# Altium PCB CLLC_PrimarySide_v5.PcbDoc
Units mm, origin at the board's own origin, x right, y up, seen from the top; angles counter-clockwise.
Board outline 205 x 135 mm, 4 copper layers (Signal_1, Int1 (GND), Int2 (PWR), Signal_2), stack 1.369 mm thick; 94 components, 29 nets, 231 pads, 0 vias.
Unrouted connection lines stored in the file: 194.
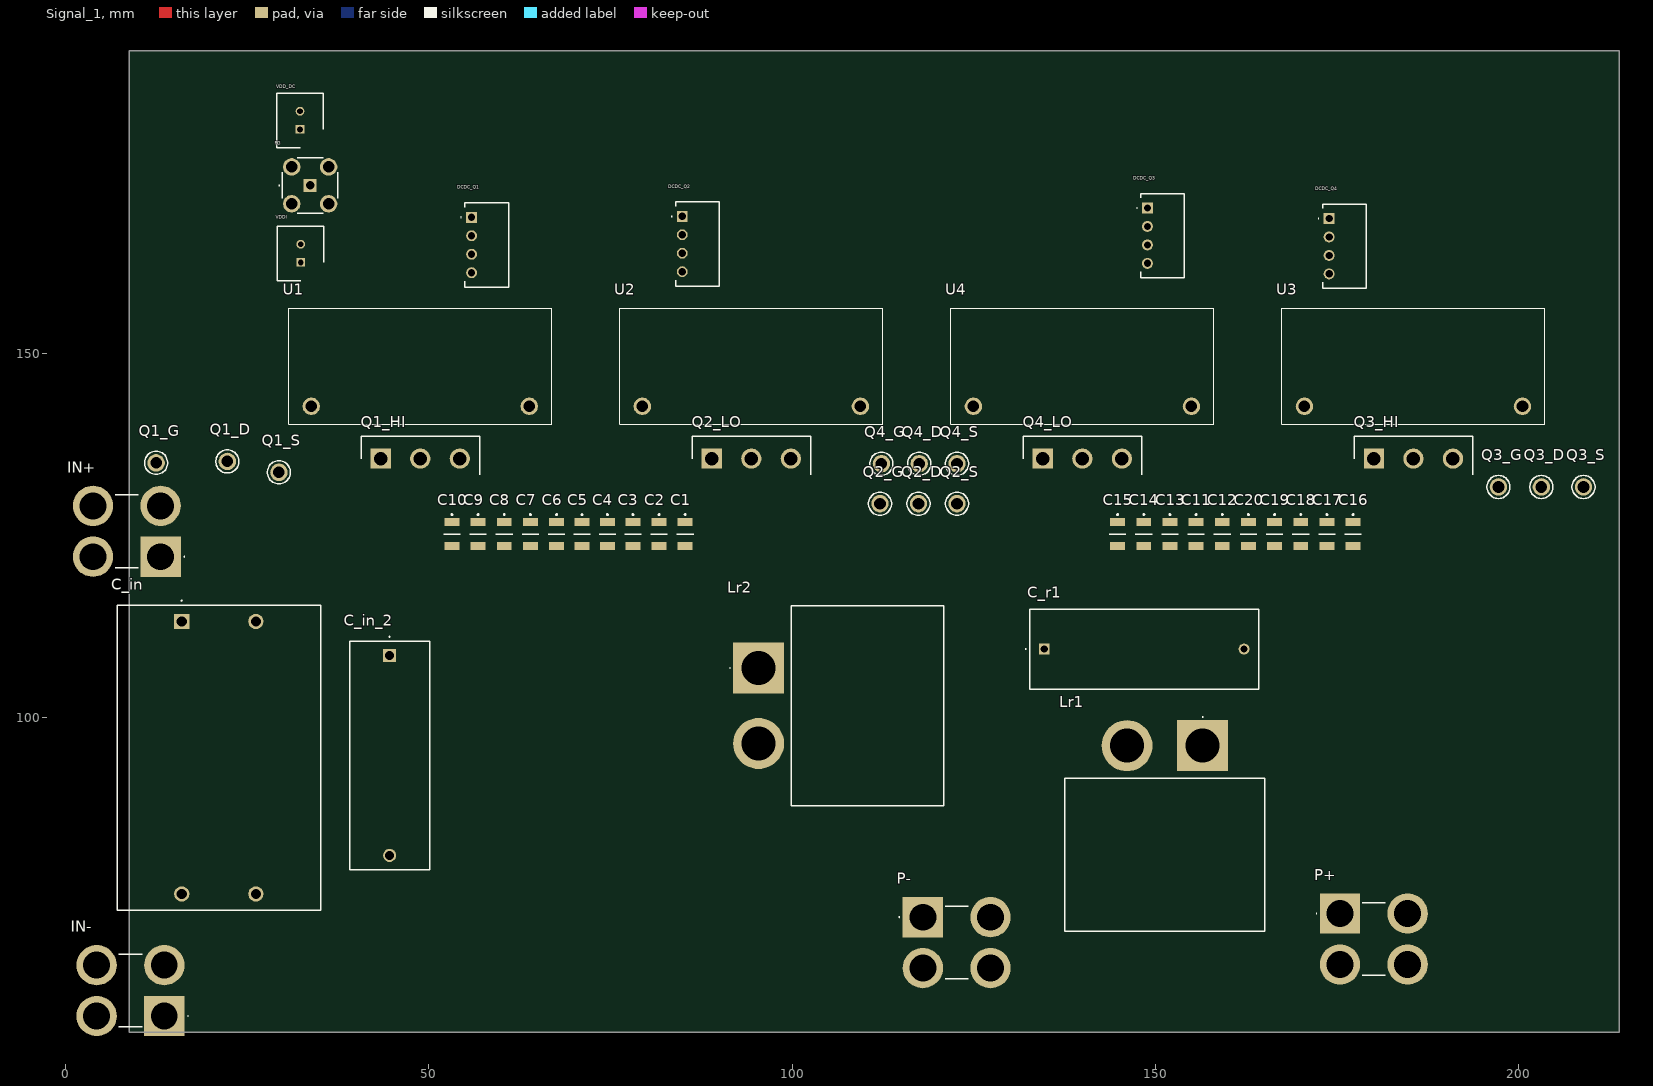
[diagram p0: Signal_1 view]
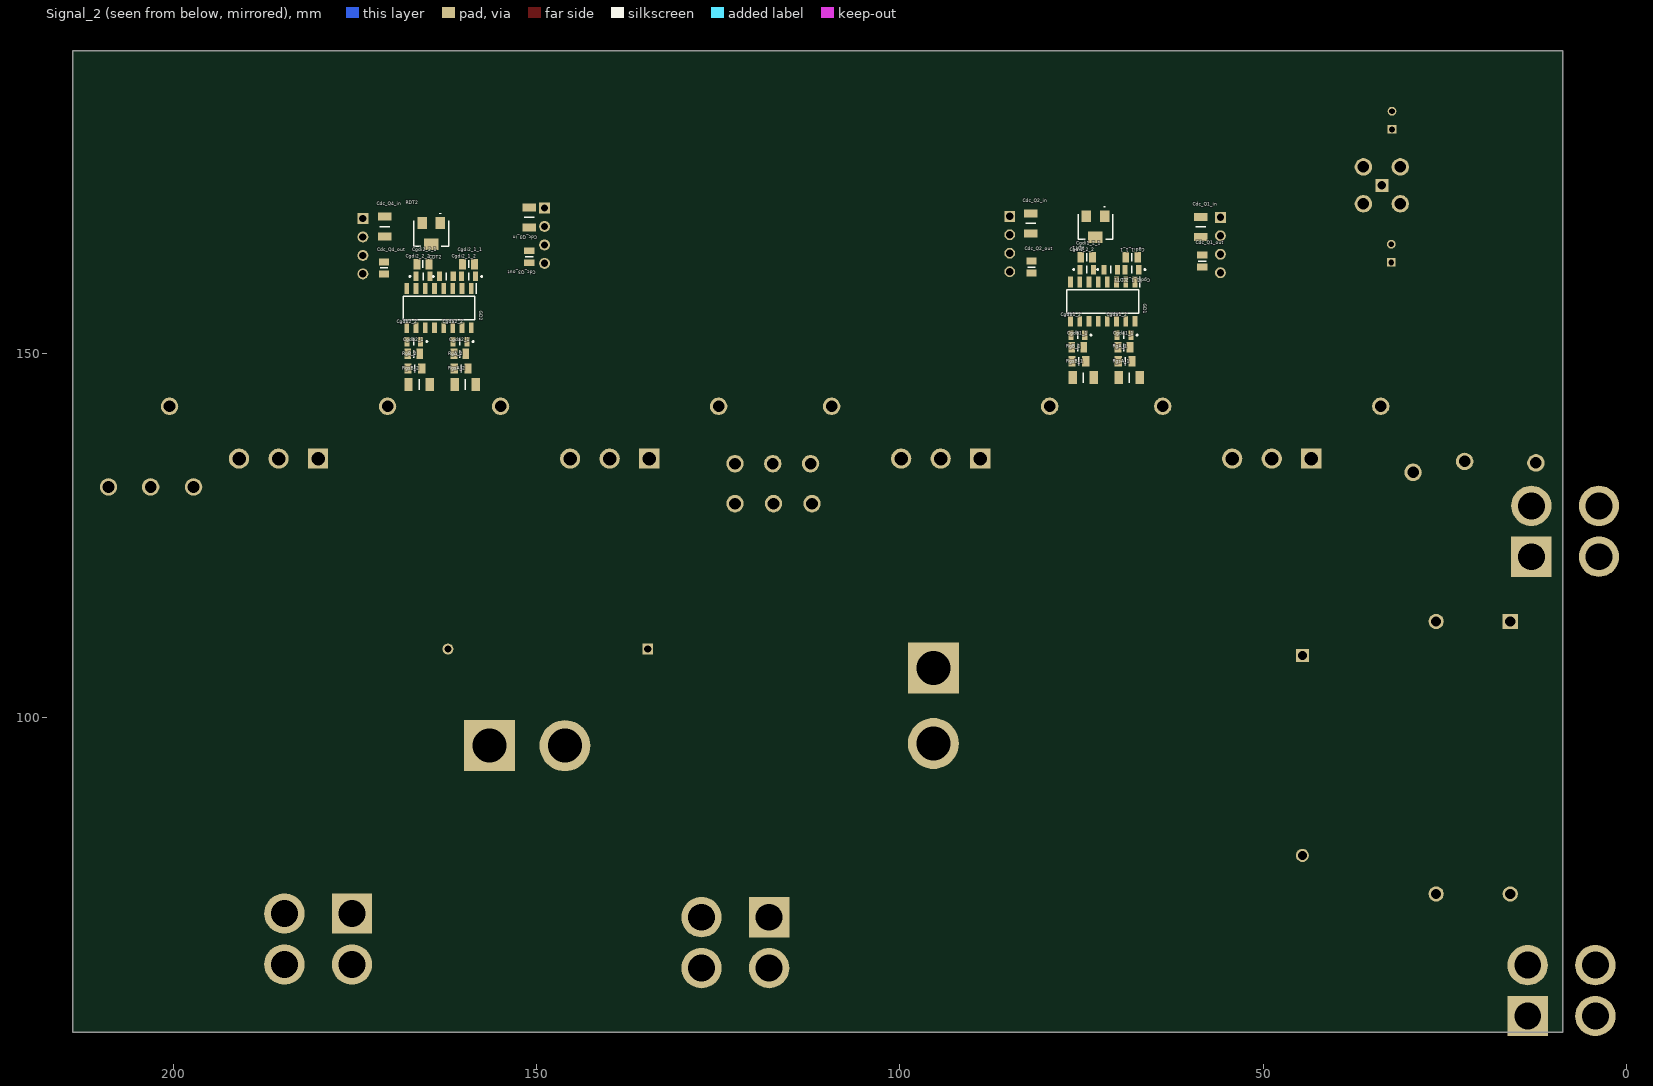
[diagram p1: Signal_2 view, seen from below]
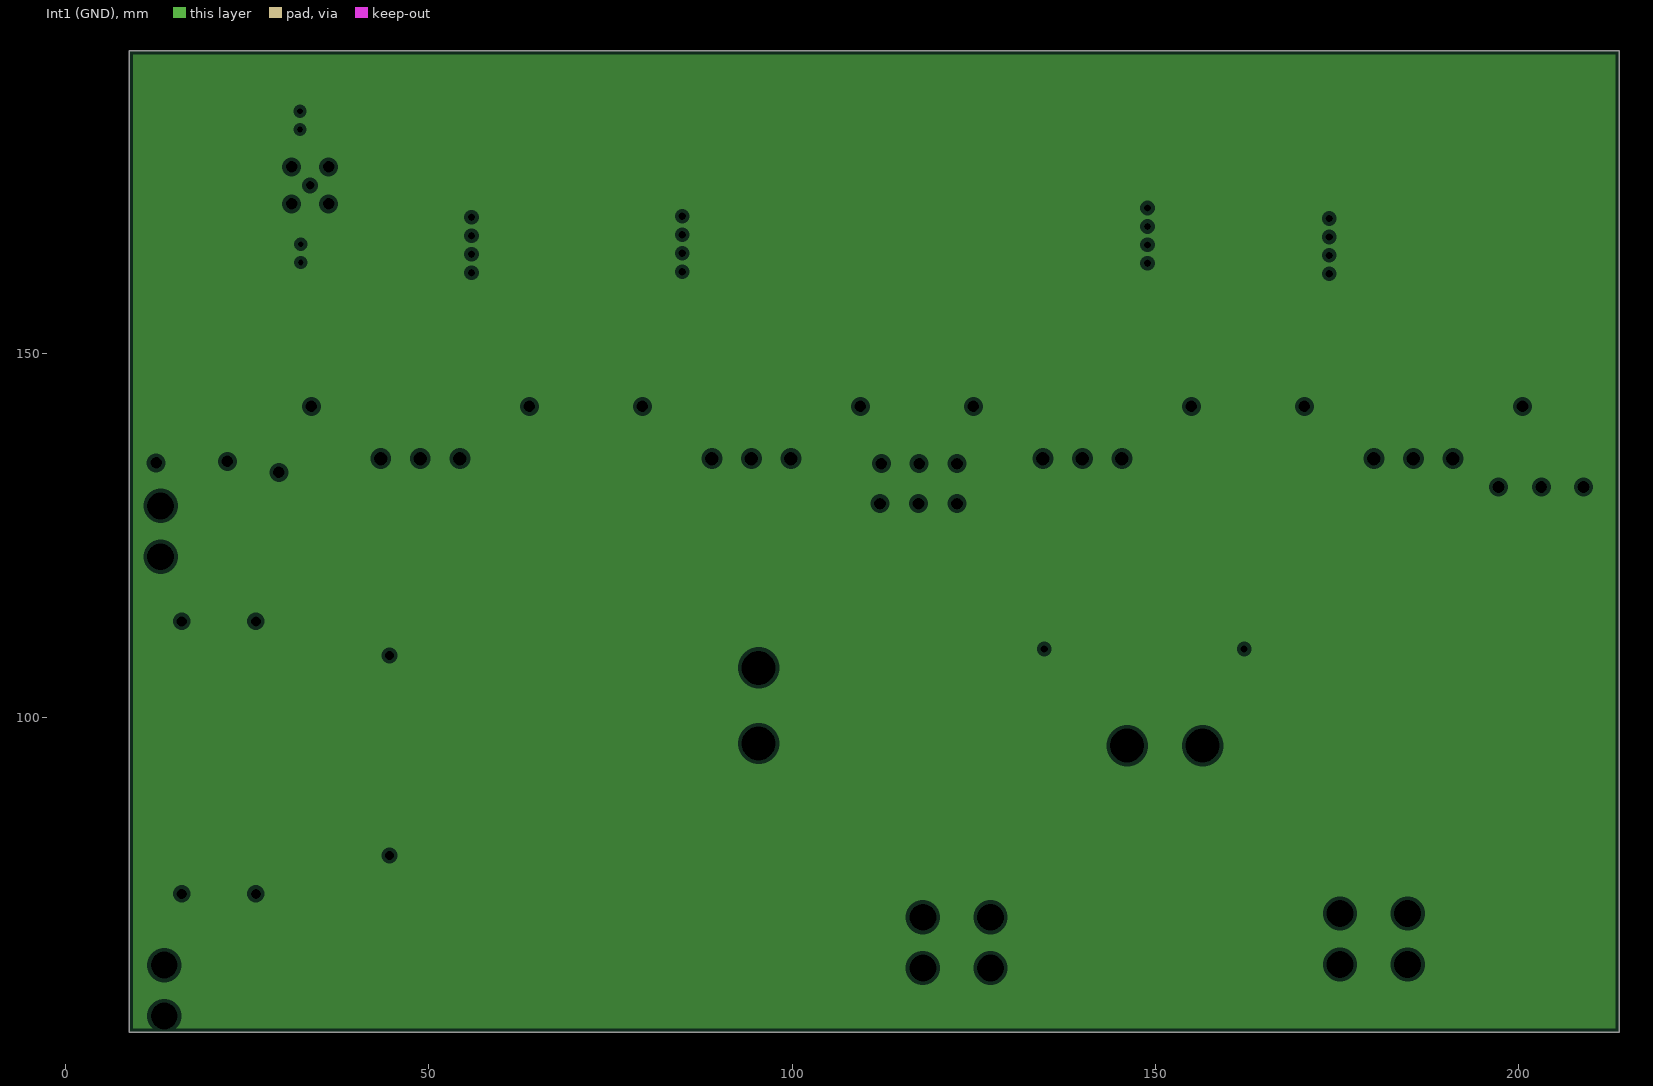
[diagram p2: Int1 (GND), clearances drawn from the general rule]
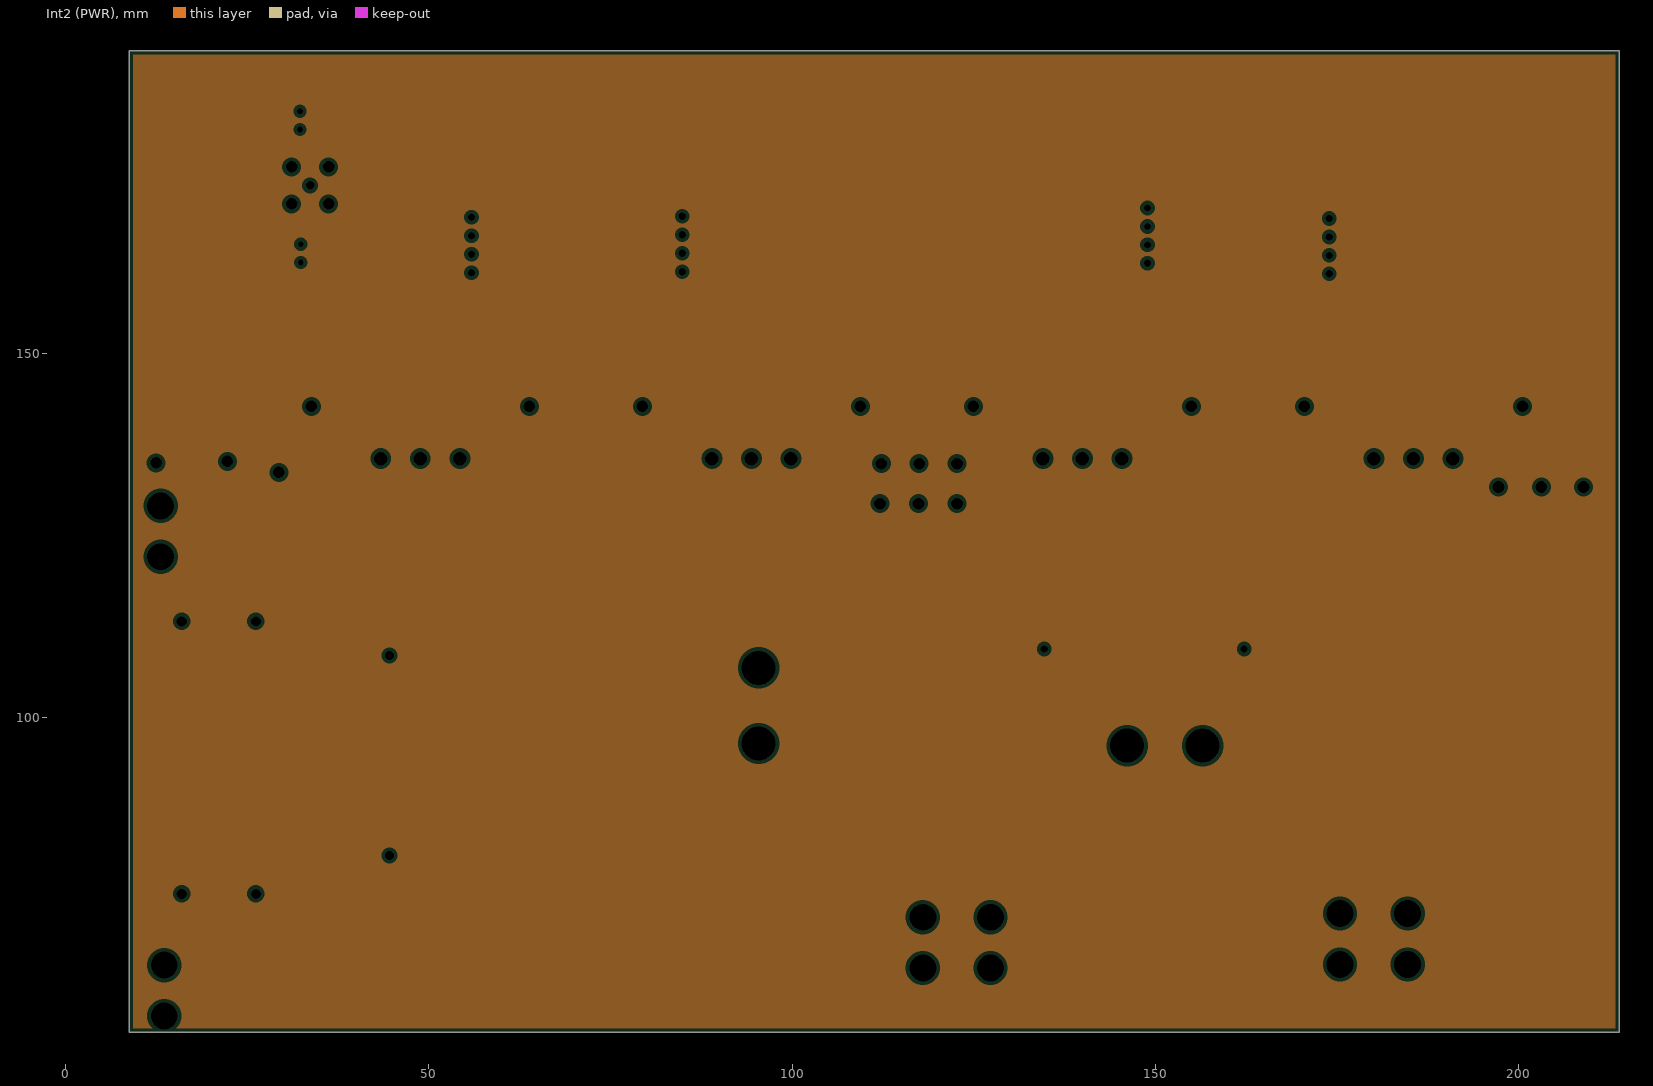
[diagram p3: Int2 (PWR), clearances drawn from the general rule]

## Layer stack, top to bottom
Top Solder: solder mask 0.0254, SM-001, Dk 4
Signal_1: signal copper 0.035
Dielectric 1: prepreg 0.1295, PP-017, Dk 4.3
Dielectric 2: prepreg 0.1295, PP-017, Dk 4.3
Int1 (GND): plane copper 0.035
Dielectric 3: core 0.7112, Core-039, Dk 4.8
Int2 (PWR): plane copper 0.035
Dielectric 4: prepreg 0.1295, PP-017, Dk 4.3
Dielectric 5: prepreg 0.1295, PP-017, Dk 4.3
Signal_2: signal copper 0.035
Bottom Solder: solder mask 0.0254, SM-001, Dk 4

## Board outline
213.8,191.7 213.8,56.699 8.8,56.699 8.8,191.7

## Design rules (kind name [scope] priority, off if disabled: settings)
Clearance [All] p1: gap=0.254 ignorepadtopadclearanceinfootprint=FALSE
PlaneClearance [All] p1: clearance=0.508
PlaneConnect [All] p1: planeconnectstyle=Relief reliefexpansion=0.508 reliefentries=4 reliefconductorwidth=0.254 reliefairgap=0.254
PolygonConnect [All] p1: connectstyle=Relief reliefconductorwidth=0.254 reliefentries=4 polygonreliefangle="90 Angle" airgapwidth=0.254
RoutingVias [All] p1: holewidth=0.711 width=1.27 viastyle="Through Hole" minholewidth=0.711 minwidth=1.27 maxholewidth=0.711 maxwidth=1.27
SolderMaskExpansion [All] p1: expansion=0.102 istentingtop=FALSE
SupplyNets "Schematic Supply Nets_1" [InNet('Q2_S')] p1: voltage=0.000
Width [All] p1: maxlimit=0.254 minlimit=0.254 preferedwidth=0.254
28 further rules are at their usual default settings.

## Classes and differential pairs
component class GD: Cdc_Q1_in Cdc_Q1_out Cdc_Q2_in Cdc_Q2_out Cdc_Q3_in Cdc_Q3_out Cdc_Q4_in Cdc_Q4_out CDT1 CDT2 Cgda1_1 Cgda1_2 Cgda2_1 Cgda2_2 Cgdb1_1 Cgdb1_2 Cgdb2_1 Cgdb2_2 Cgdi1_1_1 Cgdi1_1_2 Cgdi1_2_1 Cgdi1_2_2 Cgdi2_1_1 Cgdi2_1_2 Cgdi2_2_1 Cgdi2_2_2 DCDC_Q1 DCDC_Q2 DCDC_Q3 DCDC_Q4 FG GD1 GD2 RDT1 RDT2 RgA_1 RgA_2 RgB_1 RgB_2 RgsA_1 RgsA_2 RgsB_1 RgsB_2 VDD_DC VDDI
component class PrimarySide: C1 C2 C3 C4 C5 C6 C7 C8 C9 C10 C11 C12 C13 C14 C15 C16 C17 C18 C19 C20 C_in C_in_2 C_r1 IN+ IN- Lr1 Lr2 P+ P- Q1_D Q1_G Q1_HI Q1_S Q2_D Q2_G Q2_LO Q2_S Q3_D Q3_G Q3_HI Q3_S Q4_D Q4_G Q4_LO Q4_S U1 U2 U3 U4

## Components (designator, comment, footprint, x,y, rotation, side; value= is the part's Value field where it differs from the comment)
C1 "GCJ32DR7LV104KW01K" GCJ32x 85.3,125.2 r270 top
C2 "GCJ32DR7LV104KW01K" GCJ32x 81.7,125.2 r270 top
C3 "GCJ32DR7LV104KW01K" GCJ32x 78.1,125.2 r270 top
C4 "GCJ32DR7LV104KW01K" GCJ32x 74.6,125.2 r270 top
C5 "GCJ32DR7LV104KW01K" GCJ32x 71.1,125.2 r270 top
C6 "GCJ32DR7LV104KW01K" GCJ32x 67.6,125.2 r270 top
C7 "GCJ32DR7LV104KW01K" GCJ32x 64,125.2 r270 top
C8 "GCJ32DR7LV104KW01K" GCJ32x 60.4,125.2 r270 top
C9 "GCJ32DR7LV104KW01K" GCJ32x 56.8,125.2 r270 top
C10 "GCJ32DR7LV104KW01K" GCJ32x 53.2,125.2 r270 top
C11 "GCJ32DR7LV104KW01K" GCJ32x 155.6,125.2 r270 top
C12 "GCJ32DR7LV104KW01K" GCJ32x 159.2,125.2 r270 top
C13 "GCJ32DR7LV104KW01K" GCJ32x 152,125.2 r270 top
C14 "GCJ32DR7LV104KW01K" GCJ32x 148.4,125.2 r270 top
C15 "GCJ32DR7LV104KW01K" GCJ32x 144.8,125.2 r270 top
C16 "GCJ32DR7LV104KW01K" GCJ32x 177.2,125.2 r270 top
C17 "GCJ32DR7LV104KW01K" GCJ32x 173.6,125.2 r270 top
C18 "GCJ32DR7LV104KW01K" GCJ32x 170,125.2 r270 top
C19 "GCJ32DR7LV104KW01K" GCJ32x 166.4,125.2 r270 top
C20 "GCJ32DR7LV104KW01K" GCJ32x 162.8,125.2 r270 top
C_in "B32776P8106K000" B32776P8106K000 16.025,113.2 r270 top
C_in_2 "B32774P8105K000" B32774P8105K000 44.625,108.5 r270 top
C_r1 "C4AQQBU4140M1WJ" C4AQQBU4140M1WJ 134.7,109.4 r0 top
Cdc_Q1_in "GRM31CR71H475KA12L" CAPC3216X180N 58.6,167.48 r90 bottom
Cdc_Q1_out "GCM21BR71H105KA03L" CAPC2012X140N 58.4,162.78 r90 bottom
Cdc_Q2_in "GRM31CR71H475KA12L" CAPC3216X180N 82,167.96 r90 bottom
Cdc_Q2_out "GCM21BR71H105KA03L" CAPC2012X140N 81.9,161.96 r90 bottom
Cdc_Q3_in "GRM31CR71H475KA12L" CAPC3216X180N 151,168.78 r90 bottom
Cdc_Q3_out "GCM21BR71H105KA03L" CAPC2012X140N 151,163.38 r90 bottom
Cdc_Q4_in "GRM31CR71H475KA12L" CAPC3216X180N 170.9,167.533 r90 bottom
Cdc_Q4_out "GCM21BR71H105KA03L" CAPC2012X140N 171,161.84 r90 bottom
CDT1 "GCM21BR72A104MA37K" GCM21 71,161.603 r180 bottom
CDT2 "GCM21BR72A104MA37K" GCM21 162.409,160.666 r180 bottom
Cgda1_1 "GCM21BR71H105KA03L" CAPC2012X140N 69.185,150.903 r0 bottom
Cgda1_2 "GCM21BR72A104MA37K" GCM21 69.175,152.603 r0 bottom
Cgda2_1 "GCM21BR71H105KA03L" CAPC2012X140N 160.554,150.006 r0 bottom
Cgda2_2 "GCM21BR72A104MA37K" GCM21 160.544,151.706 r0 bottom
Cgdb1_1 "GCM21BR71H105KA03L" CAPC2012X140N 75.535,150.903 r0 bottom
Cgdb1_2 "GCM21BR72A104MA37K" GCM21 75.525,152.603 r0 bottom
Cgdb2_1 "GCM21BR71H105KA03L" CAPC2012X140N 166.904,150.006 r0 bottom
Cgdb2_2 "GCM21BR72A104MA37K" GCM21 166.894,151.706 r0 bottom
Cgdi1_1_1 "GCM21BR71H105KA03L" CAPC2012X140N 68.11,163.303 r0 bottom
Cgdi1_1_2 "GCM21BR72A104MA37K" GCM21 68.1,161.603 r0 bottom
Cgdi1_2_1 "GCM21BR71H105KA03L" CAPC2012X140N 74.31,163.303 r180 bottom
Cgdi1_2_2 "GCM21BR72A104MA37K" GCM21 74.3,161.603 r180 bottom
Cgdi2_1_1 "GCM21BR71H105KA03L" CAPC2012X140N 159.362,162.366 r0 bottom
Cgdi2_1_2 "GCM21BR72A104MA37K" GCM21 159.352,160.666 r0 bottom
Cgdi2_2_1 "GCM21BR71H105KA03L" CAPC2012X140N 165.634,162.366 r180 bottom
Cgdi2_2_2 "GCM21BR72A104MA37K" GCM21 165.624,160.666 r180 bottom
DCDC_Q1 "PQS075-S5-S15-S" PQS075S5S15S 55.9,168.8 r270 top
DCDC_Q2 "PQS075-S5-S15-S" PQS075S5S15S 84.9,168.94 r270 top
DCDC_Q3 "PQS075-S5-S15-S" PQS075S5S15S 148.9,170.087 r270 top
DCDC_Q4 "PQS075-S5-S15-S" PQS075S5S15S 173.9,168.64 r270 top
FG "413990-1" 4139901 33.7,173.2 r0 top
GD1 "SI8274GB4D-IS1" SOIC127P600X175-16N 72.1,157.2 r270 bottom
GD2 "SI8274GB4D-IS1" SOIC127P600X175-16N 163.424,156.306 r270 bottom
IN+ "AMT0450028DB0000G" AMT0450028DB0000G 13.125,122.1 r90 top
IN- "AMT0450028DB0000G" AMT0450028DB0000G 13.625,58.9 r90 top
Lr1 "ER26A2DC-6R8K" ER26A2DC6R8K 156.5,96.1 r180 top
Lr2 "ER26A2DC-6R8K" ER26A2DC6R8K 95.4,106.8 r270 top
P+ "AMT0450028DB0000G" AMT0450028DB0000G 175.4,73 r270 top
P- "AMT0450028DB0000G" AMT0450028DB0000G 118,72.5 r270 top
Q1_D "5013" 5013 22.3,135.214 r270 top
Q1_G "5013" 5013 12.5,135.014 r270 top
Q1_HI "IPW65R050CFD7AXKSA1" TO544P530X1590X2600-3P 43.41,135.6 r0 top
Q1_S "5013" 5013 29.4,133.714 r270 top
Q2_D "5013" 5013 117.4,129.4 r270 top
Q2_G "5013" 5013 112.1,129.4 r270 top
Q2_LO "IPW65R050CFD7AXKSA1" TO544P530X1590X2600-3P 88.96,135.6 r0 top
Q2_S "5013" 5013 122.7,129.4 r270 top
Q3_D "5013" 5013 203.1,131.7 r270 top
Q3_G "5013" 5013 197.2,131.7 r270 top
Q3_HI "IPW65R050CFD7AXKSA1" TO544P530X1590X2600-3P 180.06,135.6 r0 top
Q3_S "5013" 5013 208.9,131.7 r270 top
Q4_D "5013" 5013 117.5,134.9 r270 top
Q4_G "5013" 5013 112.3,134.9 r270 top
Q4_LO "IPW65R050CFD7AXKSA1" TO544P530X1590X2600-3P 134.51,135.6 r0 top
Q4_S "5013" 5013 122.7,134.9 r270 top
RDT1 "3224W-1-104G" 3224W1104G 73.1,167.503 r270 bottom
RDT2 "3224W-1-104G" 3224W1104G 164.509,166.566 r270 bottom
RgA_1 "ESR10EZPF15R0" RESC2012X65N 69.025,149 r0 bottom
RgA_2 "ESR10EZPF15R0" RESC2012X65N 160.394,148.006 r180 bottom
RgB_1 "ESR10EZPF15R0" RESC2012X65N 75.375,149 r0 bottom
RgB_2 "ESR10EZPF15R0" RESC2012X65N 166.744,148.006 r180 bottom
RgsA_1 "ESR18EZPF1002" RESC3216X65N 68.45,146.743 r0 bottom
RgsA_2 "ESR18EZPF1002" RESC3216X65N 159.819,145.806 r0 bottom
RgsB_1 "ESR18EZPF1002" RESC3216X65N 74.8,146.743 r0 bottom
RgsB_2 "ESR18EZPF1002" RESC3216X65N 166.169,145.806 r0 bottom
U1 "BPUE36-30" BPUE3630 63.85,142.8 r180 top
U2 "BPUE36-30" BPUE3630 109.4,142.8 r180 top
U3 "BPUE36-30" BPUE3630 200.5,142.8 r180 top
U4 "BPUE36-30" BPUE3630 154.95,142.8 r180 top
VDD_DC "B02B-XASK-1_LF__SN_" SHDR2W60P0X250_1X2_750X640X880P 32.3,180.9 r90 top
VDDI "B02B-XASK-1_LF__SN_" SHDR2W60P0X250_1X2_750X640X880P 32.4,162.6 r90 top

## Footprints (in the part's own frame and the unit in brackets; to place one, negate y for a bottom-side part, rotate by r counter-clockwise, add the part's x,y. Pads: shape width x height; smd on the part's side, far side on the other; paste and mask are expansions set on the pad)
3224W1104G [mm]
  rect 1.6x1.3 smd: 1(-1.45,1.25) 3(-1.45,-1.25)
  rect 1.6x2 smd: 2(1.45,0)
  silkscreen extent -2.8,-2.4 1.75,2.4, body extent -2.12,-2.4 2.09,2.4, height 5.65
5013 [mm]
  round 2.4 hole 1.6: 1(0,0)
  silkscreen extent -1.59,-1.59 1.59,1.59, body extent -1.58,-1.59 1.58,1.59, height 8.63
4139901 [mm]
  rect 1.785x1.785 hole 1.19: 1(0,0)
  round 2.4 hole 1.6: 2(-2.54,-2.54) 3(2.54,-2.54) 4(2.54,2.54) 5(-2.54,2.54)
  silkscreen extent -4.3,-3.81 3.81,3.81, body extent -3.17,-3.17 3.17,3.17, height 8.05
AMT0450028DB0000G [mm]
  rect 5.55x5.55 hole 3.7: 1(0,0)
  round 5.55 hole 3.7: 2(0,9.3) 3(7,0) 4(7,9.3)
  silkscreen extent -1.5,-3.3 8.5,6.25, body extent -1.5,-0.6 8.5,9.9, height 7.59
B32774P8105K000 [mm]
  rect 1.8x1.8 hole 1.2: 1(0,0)
  round 1.8 hole 1.2: 2(27.5,0)
  silkscreen extent -2.65,-5.5 29.5,5.5, body extent -2,-5.5 29.5,5.5, height 18.75
B32776P8106K000 [mm]
  rect 2.1x2.1 hole 1.4: 1(0,0)
  round 2.1 hole 1.4: 2(37.5,0) 3(0,10.2) 4(37.5,10.2)
  silkscreen extent -2.9,-8.9 39.75,19.1, body extent -2.25,-8.9 39.75,19.1, height 37.1
BPUE3630 [mm]
  round 2.4 hole 1.6: 1(0,0) 2(30,0)
  silkscreen extent -3.1,-13.5 33.1,2.5, body extent -3.1,-13.5 33.1,2.5, height 30.1
C4AQQBU4140M1WJ [mm]
  rect 1.5x1.5 hole 1: 1(0,0)
  round 1.5 hole 1: 2(27.5,0)
  silkscreen extent -2.6,-5.5 29.5,5.5, body extent -2.25,-5.66 29.75,5.65, height 20.16
CAPC2012X140N [mm]
  rect 0.94x1.43 smd: 1(-0.82,0) 2(0.82,0)
  silkscreen extent 0,-0.53 0,0.53, body extent -1,-0.63 1,0.63, height 1.4
CAPC3216X180N [mm]
  rect 1.07x1.82 smd: 1(-1.38,0) 2(1.38,0)
  silkscreen extent 0,-0.7 0,0.7, body extent -1.6,-0.8 1.6,0.8, height 1.8
ER26A2DC6R8K [mm]
  round 7.02 hole 4.68: F1(10.4,0)
  rect 7.02x7.02 hole 4.68: S1(0,0)
  silkscreen extent -8.55,-4 18.95,25.5, body extent -8.55,-2.23 18.95,25.5, height 17.1
GCJ32x [mm]
  rect 1.1x2.05 smd: 1(-1.65,0) 2(1.65,0)
  silkscreen extent -2.8,-1.15 0,1.15, body extent -2.09,-1.25 2.09,1.25, height 1.6
GCM21 [mm]
  rect 0.7x1.3 smd: 1(-0.95,0) 2(0.95,0)
  silkscreen extent -1.9,-0.53 0,0.53, body extent -1.1,-0.63 1.1,0.63, height 1.45
PQS075S5S15S [mm]
  rect 1.5x1.5 hole 1: 1(0,0)
  round 1.5 hole 1: 2(2.54,0) 3(5.08,0) 4(7.62,0)
  silkscreen extent -1.99,-1.5 9.61,5.1, body extent -1.99,-0.89 9.61,5.1, height 10.26
RESC2012X65N [mm]
  rect 1x1.4 smd: 1(-0.95,0) 2(0.95,0)
  silkscreen extent 0,-0.53 0,0.53, body extent -1,-0.63 1,0.63, height 0.65
RESC3216X65N [mm]
  rect 1.15x1.8 smd: 1(-1.45,0) 2(1.45,0)
  silkscreen extent 0,-0.7 0,0.7, body extent -1.6,-0.8 1.6,0.8, height 0.65
SHDR2W60P0X250_1X2_750X640X880P [mm]
  rect 1.2x1.2 hole 0.8: 1(0,0)
  round 1.2 hole 0.8: 2(2.5,0)
  silkscreen extent -2.5,-3.2 5,3.2, body extent -2.5,-3.2 5,3.2, height 8.8
SOIC127P600X175-16N [mm]
  rect 1.5x0.65 smd: 1(-2.7,4.445) 2(-2.7,3.175) 3(-2.7,1.905) 4(-2.7,0.635) 5(-2.7,-0.635) 6(-2.7,-1.905) 7(-2.7,-3.175) 8(-2.7,-4.445) 9(2.7,-4.445) 10(2.7,-3.175) 11(2.7,-1.905) 12(2.7,-0.635) 13(2.7,0.635) 14(2.7,1.905) 15(2.7,3.175) 16(2.7,4.445)
  silkscreen extent -3.45,-4.95 1.6,5.12, body extent -3,-4.95 3,4.95, height 1.75
TO544P530X1590X2600-3P [mm]
  rect 2.79x2.79 hole 1.86: 1(0,0)
  round 2.79 hole 1.86: 2(5.44,0) 3(10.88,0)
  silkscreen extent -2.71,-2.25 13.59,3.05, body extent -2.51,-2.25 13.39,3.05, height 26

## Part data
C1 C2 C3 C4 C5 C6 C7 C8 C9 C10 C11 C12 C13 C14 C15 C16 C17 C18 C19 C20: "Capacitor", Manufacturer_Name="Murata Electronics", Mouser Part Number=81-GCJ32D7LV104KW01K, Arrow Part Number=GCJ32DR7LV104KW01K, Arrow Price/Stock=https://www.arrow.com/en/products/gcj32dr7lv104kw01k/murata-manufacturing?region=nac, Datasheet Link=https://search.murata.co.jp/Ceramy/image/img/A01X/G101/ENG/GCJ32DR7LV104KW01-00B.pdf, Height=1.5mm, Manufacturer_Part_Number=GCJ32DR7LV104KW01K, Mouser Price/Stock=https://www.mouser.co.uk/ProductDetail/Murata-Electronics/GCJ32DR7LV104KW01K?qs=By6Nw2ByBD2ciFrUl9IBhg%3D%3D
C_in: "Capacitor", Manufacturer_Name=TDK, Mouser Part Number=871-B32776P8106K000, Datasheet Link=https://product.tdk.com/system/files/dam/doc/product/capacitor/film/mkp_mfp/data_sheet/20/20/ds/mkp_b32774p_778p.pdf, Height=37mm, Manufacturer_Part_Number=B32776P8106K000, Mouser Price/Stock=https://www.mouser.co.uk/ProductDetail/EPCOS-TDK/B32776P8106K000?qs=nmF%252BdLtsfhVT2hemhPYoWA%3D%3D
C_in_2: "Capacitor", Manufacturer_Name=TDK, Mouser Part Number=871-B32774P8105K000, Datasheet Link=https://product.tdk.com/system/files/dam/doc/product/capacitor/film/mkp_mfp/data_sheet/20/20/ds/mkp_b32774p_778p.pdf, Height=19mm, Manufacturer_Part_Number=B32774P8105K000, Mouser Price/Stock=https://www.mouser.co.uk/ProductDetail/EPCOS-TDK/B32774P8105K000?qs=nmF%252BdLtsfhWqESChDIGAwQ%3D%3D
C_r1: "Capacitor", Manufacturer_Name=KEMET, Mouser Part Number=80-C4AQQBU4140M1WJ, Datasheet Link=https://search.kemet.com/component-documentation/download/specsheet/C4AQQBU4140M1WJ, Height=20.2mm, Manufacturer_Part_Number=C4AQQBU4140M1WJ, Mouser Price/Stock=https://www.mouser.co.uk/ProductDetail/KEMET/C4AQQBU4140M1WJ?qs=81r%252BiQLm7BSMlBltxrghzA%3D%3D
Cdc_Q1_in Cdc_Q2_in Cdc_Q3_in Cdc_Q4_in: "Capacitor", Manufacturer_Name="Murata Electronics", Mouser Part Number=81-GRM31CR71H475KA2L, Arrow Part Number=GRM31CR71H475KA12L, Arrow Price/Stock=https://www.arrow.com/en/products/grm31cr71h475ka12l/murata-manufacturing?utm_currency=USD&region=nac, Datasheet Link=https://search.murata.co.jp/Ceramy/image/img/A01X/G101/ENG/GRM31CR71H475KA12-01A.pdf, Height=1.8mm, Manufacturer_Part_Number=GRM31CR71H475KA12L, Mouser Price/Stock=https://www.mouser.co.uk/ProductDetail/Murata-Electronics/GRM31CR71H475KA12L?qs=QOxk%252BkhTc6I%252BVQUsJuOHog%3D%3D
Cdc_Q1_out Cdc_Q2_out Cdc_Q3_out Cdc_Q4_out Cgda1_1 Cgda2_1 Cgdb1_1 Cgdb2_1 Cgdi1_1_1 Cgdi1_2_1 Cgdi2_1_1 Cgdi2_2_1: "Capacitor", Manufacturer_Name="Murata Electronics", Mouser Part Number=81-GCM21BR71H105KA3L, Arrow Part Number=GCM21BR71H105KA03L, Arrow Price/Stock=https://www.arrow.com/en/products/gcm21br71h105ka03l/murata-manufacturing?utm_currency=USD&region=nac, Datasheet Link=https://search.murata.co.jp/Ceramy/image/img/A01X/G101/ENG/GCM21BR71H105KA03-01A.pdf, Height=1.4mm, Manufacturer_Part_Number=GCM21BR71H105KA03L, Mouser Price/Stock=https://www.mouser.co.uk/ProductDetail/Murata-Electronics/GCM21BR71H105KA03L?qs=74rrZF77WIzs3UJkpPZdKw%3D%3D
CDT1 CDT2 Cgda1_2 Cgda2_2 Cgdb1_2 Cgdb2_2 Cgdi1_1_2 Cgdi1_2_2 Cgdi2_1_2 Cgdi2_2_2: "Capacitor", Manufacturer_Name="Murata Electronics", Datasheet Link=https://search.murata.co.jp/Ceramy/image/img/A01X/G101/ENG/GCM21BR72A104MA37-01A.pdf, Height=1.4mm, Manufacturer_Part_Number=GCM21BR72A104MA37K
DCDC_Q1 DCDC_Q2 DCDC_Q3 DCDC_Q4: "Integrated Circuit", Manufacturer_Name="CUI Inc.", Mouser Part Number=490-PQS075-S5-S15-S, Datasheet Link=https://www.cui.com/product/resource/pdf/pqs075-s.pdf, Height=10.41mm, Manufacturer_Part_Number=PQS075-S5-S15-S, Mouser Price/Stock=https://www.mouser.co.uk/ProductDetail/CUI-Inc/PQS075-S5-S15-S/?qs=26oI9%252Bq63sIfifa58tSGNg%3D%3D
FG: "Connector", Manufacturer_Name="TE Connectivity", Mouser Part Number=571-4139901, Arrow Part Number=413990-1, Arrow Price/Stock=https://www.arrow.com/en/products/413990-1/te-connectivity?region=europe, Datasheet Link=https://www.te.com/commerce/DocumentDelivery/DDEController?Action=srchrtrv&DocNm=1307191_SMB_Connectors&DocType=Catalog%20Section&DocLang=English&PartCntxt=413990-1&DocFormat=pdf, Height=7.62mm, Manufacturer_Part_Number=413990-1, Mouser Price/Stock=https://www.mouser.co.uk/ProductDetail/TE-Connectivity/413990-1?qs=7QuPeZUaY4GhWa7hqv5PMQ%3D%3D
GD1 GD2: "Integrated Circuit", Manufacturer_Name=Skyworks, Mouser Part Number=634-SI8274GB4D-IS1, Datasheet Link=https://www.skyworksinc.com/-/media/Skyworks/SL/documents/public/data-sheets/Si827x.pdf, Height=1.75mm, Manufacturer_Part_Number=SI8274GB4D-IS1, Mouser Price/Stock=https://www.mouser.co.uk/ProductDetail/Skyworks-Solutions-Inc/SI8274GB4D-IS1?qs=j6MGy4L9yX3Ou%2FIj7aSdKQ%3D%3D
IN+ IN- P+ P-: "Connector", Manufacturer_Name=Amphenol, Mouser Part Number=523-AMT0450028DB000G, Datasheet Link=https://www.anytek.com.cn/Upload/AMT45028DB-821f25108d7e4e0caa268ff3448ada5b.pdf, Height=7.4mm, Manufacturer_Part_Number=AMT0450028DB0000G, Mouser Price/Stock=https://www.mouser.co.uk/ProductDetail/Amphenol-Anytek/AMT0450028DB0000G?qs=ST9lo4GX8V0in%252BhOLfQ9xA%3D%3D
Lr1 Lr2: "Inductor", Manufacturer_Name=Bourns, Datasheet Link=https://www.bourns.com/docs/product-datasheets/er26a.pdf, Height=17mm, Manufacturer_Part_Number=ER26A2DC-6R8K
Q1_D Q1_G Q1_S Q2_D Q2_G Q2_S Q3_D Q3_G Q3_S Q4_D Q4_G Q4_S: "Test Point", Manufacturer_Name="Keystone Electronics", Mouser Part Number=534-5013, Manufacturer_Part_Number=5013, Height=8.28mm, Datasheet Link=http://www.keyelco.com/product-pdf.cfm?p=1322, Mouser Price/Stock=https://www.mouser.co.uk/ProductDetail/Keystone-Electronics/5013?qs=qOqV1E1P08RLig9vMFtXag%3D%3D
Q1_HI Q2_LO Q3_HI Q4_LO: "MOSFET (N-Channel)", Manufacturer_Name=Infineon, Mouser Part Number=726-IPW65R050CFD7AXK, Arrow Part Number=IPW65R050CFD7AXKSA1, Arrow Price/Stock=https://www.arrow.com/en/products/ipw65r050cfd7axksa1/infineon-technologies-ag?region=europe, Datasheet Link=https://www.infineon.com/dgdl/Infineon-IPW65R050CFD7A-DataSheet-v02_01-EN.pdf?fileId=5546d46271bf4f920171c0167ea2084c, Height=5.3mm, Manufacturer_Part_Number=IPW65R050CFD7AXKSA1, Mouser Price/Stock=https://www.mouser.co.uk/ProductDetail/Infineon-Technologies/IPW65R050CFD7AXKSA1?qs=OlC7AqGiEDm4ztoS376shw%3D%3D
RDT1 RDT2: "Variable Resistor", Manufacturer_Name=Bourns, Mouser Part Number=652-3224W-1-104G, Arrow Part Number=3224W-1-104G, Arrow Price/Stock=https://www.arrow.com/en/products/3224w-1-104g/bourns, Datasheet Link=https://www.bourns.com/docs/product-datasheets/3224.pdf?sfvrsn=c872982f_10, Height=5.55mm, Manufacturer_Part_Number=3224W-1-104G, Mouser Price/Stock=https://www.mouser.co.uk/ProductDetail/Bourns/3224W-1-104G?qs=tEaODSGlU8NOeIAULE3a4g%3D%3D
RgA_1 RgA_2 RgB_1 RgB_2: "Resistor", Manufacturer_Name="ROHM Semiconductor", Mouser Part Number=755-ESR10EZPF15R0, Datasheet Link=https://fscdn.rohm.com/en/products/databook/datasheet/passive/resistor/chip_resistor/esr-e.pdf, Height=0.65mm, Manufacturer_Part_Number=ESR10EZPF15R0, Mouser Price/Stock=https://www.mouser.co.uk/ProductDetail/ROHM-Semiconductor/ESR10EZPF15R0?qs=DyUWGjl%252BcVuuTlFPYREySw%3D%3D
RgsA_1 RgsA_2 RgsB_1 RgsB_2: "Resistor", Manufacturer_Name="ROHM Semiconductor", Mouser Part Number=755-ESR18EZPF1002, Arrow Part Number=ESR18EZPF1002, Arrow Price/Stock=https://www.arrow.com/en/products/esr18ezpf1002/rohm-semiconductor, Datasheet Link=https://datasheet.datasheetarchive.com/originals/distributors/Datasheets_SAMA/30ccb516c688c96e56c83a00b77a93f4.pdf, Height=0.65mm, Manufacturer_Part_Number=ESR18EZPF1002, Mouser Price/Stock=https://www.mouser.com/Search/Refine.aspx?Keyword=755-ESR18EZPF1002
U1 U2 U3 U4: "Undefined or Miscellaneous", Manufacturer_Name="Mizutani Electric", Datasheet Link=https://docs.rs-online.com/dd83/0900766b81241ab2.pdf, Height=30mm, Manufacturer_Part_Number=BPUE36-30
VDD_DC VDDI: "Connector", Arrow Part Number=B02B-XASK-1(LF)(SN), Manufacturer_Name="JST (JAPAN SOLDERLESS TERMINALS)", Mouser Part Number=N/A, Arrow Price/Stock=https://www.arrow.com/en/products/b02b-xask-1-lf-sn/jst-manufacturing?utm_currency=USD&region=europe, Datasheet Link=http://www.jst-mfg.com/product/pdf/eng/eXA1.pdf, Height=8.8mm, Manufacturer_Part_Number=B02B-XASK-1(LF)(SN), Mouser Price/Stock=https://www.mouser.co.uk/ProductDetail/JST-Commercial/B02B-XASK-1LFSN?qs=IKkN%2F947nfBty2GocXf7QA%3D%3D

## Nets (pads, with @x,y where several pads share a name; then routed paths per layer and width w, separated by ;. In a path a pad name is that pad's centre, name@x,y a point inside that pad or via, vN(x,y) a via of type N, cw(c..) or ccw(c..) an arc to the next point about the centre after c; other vN are vias at no path point)
NetC_r1_2: C_r1.2 Lr1.F1
NetCdc_Q1_in_1: Cdc_Q1_in.1 Cdc_Q2_in.1 Cdc_Q3_in.1 Cdc_Q4_in.1 DCDC_Q1.2 DCDC_Q2.2 DCDC_Q3.2 DCDC_Q4.2 VDD_DC.1
NetCdc_Q1_in_2: Cdc_Q1_in.2 Cdc_Q2_in.2 Cdc_Q3_in.2 Cdc_Q4_in.2 CDT1.2 CDT2.2 Cgdi1_1_1.2 Cgdi1_1_2.2 Cgdi1_2_1.2 Cgdi1_2_2.2 Cgdi2_1_1.2 Cgdi2_1_2.2 Cgdi2_2_1.2 Cgdi2_2_2.2 DCDC_Q1.1 DCDC_Q2.1 DCDC_Q3.1 DCDC_Q4.1 FG.2 FG.3 FG.4 FG.5 GD1.4 GD2.4 RDT1.1 RDT2.1 VDD_DC.2 VDDI.2
NetCdc_Q1_out_1: Cdc_Q1_out.1 Cgda1_1.1 Cgda1_2.1 DCDC_Q1.4 GD1.16
NetCdc_Q2_out_1: Cdc_Q2_out.1 Cgdb1_1.1 Cgdb1_2.1 DCDC_Q2.4 GD1.11
NetCdc_Q3_out_1: Cdc_Q3_out.1 Cgda2_1.1 Cgda2_2.1 DCDC_Q3.4 GD2.16
NetCdc_Q4_out_1: Cdc_Q4_out.1 Cgdb2_1.1 Cgdb2_2.1 DCDC_Q4.4 GD2.11
NetCDT1_1: CDT1.1 GD1.6 RDT1.2 RDT1.3
NetCDT2_1: CDT2.1 GD2.6 RDT2.2 RDT2.3
NetCgdi1_1_1_1: Cgdi1_1_1.1 Cgdi1_1_2.1 GD1.3
NetCgdi1_2_1_1: Cgdi1_2_1.1 Cgdi1_2_2.1 GD1.8
NetCgdi2_1_1_1: Cgdi2_1_1.1 Cgdi2_1_2.1 GD2.3
NetCgdi2_2_1_1: Cgdi2_2_1.1 Cgdi2_2_2.1 GD2.8
NetFG_1: FG.1 GD1.1 GD2.1
NetGD1_5: GD1.5 GD2.5 VDDI.1
NetGD1_10: GD1.10 RgB_1.1
NetGD1_15: GD1.15 RgA_1.1
NetGD2_10: GD2.10 RgB_2.1
NetGD2_15: GD2.15 RgA_2.1
NetLr1_S1: Lr1.S1 P+.1 P+.2 P+.3 P+.4
NetLr2_F1: Lr2.F1 P-.1 P-.2 P-.3 P-.4
Q1_D: C1.1 C2.1 C3.1 C4.1 C5.1 C6.1 C7.1 C8.1 C9.1 C10.1 C11.1 C12.1 C13.1 C14.1 C15.1 C16.1 C17.1 C18.1 C19.1 C20.1 C_in.1 C_in.3 C_in_2.1 IN+.1 IN+.2 IN+.3 IN+.4 Q1_D.1 Q1_HI.2 Q3_D.1 Q3_HI.2
Q1_G: Q1_G.1 Q1_HI.1 RgA_1.2 RgsA_1.1
Q1_S: C_r1.1 Cdc_Q1_out.2 Cgda1_1.2 Cgda1_2.2 DCDC_Q1.3 GD1.14 Q1_HI.3 Q1_S.1 Q2_D.1 Q2_LO.2 RgsA_1.2
Q2_G: Q2_G.1 Q2_LO.1 RgB_1.2 RgsB_1.1
Q2_S: C1.2 C2.2 C3.2 C4.2 C5.2 C6.2 C7.2 C8.2 C9.2 C10.2 C11.2 C12.2 C13.2 C14.2 C15.2 C16.2 C17.2 C18.2 C19.2 C20.2 C_in.2 C_in.4 C_in_2.2 Cdc_Q2_out.2 Cdc_Q3_out.2 Cgda2_1.2 Cgda2_2.2 Cgdb1_1.2 Cgdb1_2.2 DCDC_Q2.3 DCDC_Q3.3 GD1.9 GD2.14 IN-.1 IN-.2 IN-.3 IN-.4 Q2_LO.3 Q2_S.1 Q4_LO.3 Q4_S.1 RgsA_2.2 RgsB_1.2 U1.1 U1.2 U2.1 U2.2 U3.1 U3.2 U4.1 U4.2
Q3_G: Q3_G.1 Q3_HI.1 RgB_2.2 RgsB_2.1
Q3_S: Cdc_Q4_out.2 Cgdb2_1.2 Cgdb2_2.2 DCDC_Q4.3 GD2.9 Lr2.S1 Q3_HI.3 Q3_S.1 Q4_D.1 Q4_LO.2 RgsB_2.2
Q4_G: Q4_G.1 Q4_LO.1 RgA_2.2 RgsA_2.1
pads on no net: GD1.2 GD1.7 GD1.12 GD1.13 GD2.2 GD2.7 GD2.12 GD2.13

## Polygon pours and split planes (outlines as drawn)
no net on Int1 (GND) (split plane): 213.29,57.209 9.31,57.209 9.31,191.19 213.29,191.19
no net on Int2 (PWR) (split plane): 213.29,57.209 9.31,57.209 9.31,191.19 213.29,191.19